# Altium PCB BAT.pcbdoc
Units mil, origin at the board's own origin, x right, y up, seen from the top; angles counter-clockwise.
Board outline 984.3 x 1574.8 mil, 2 copper layers (Top Layer, Bottom Layer), stack 62.2 mil thick; 32 components, 23 nets, 121 pads, 61 vias.
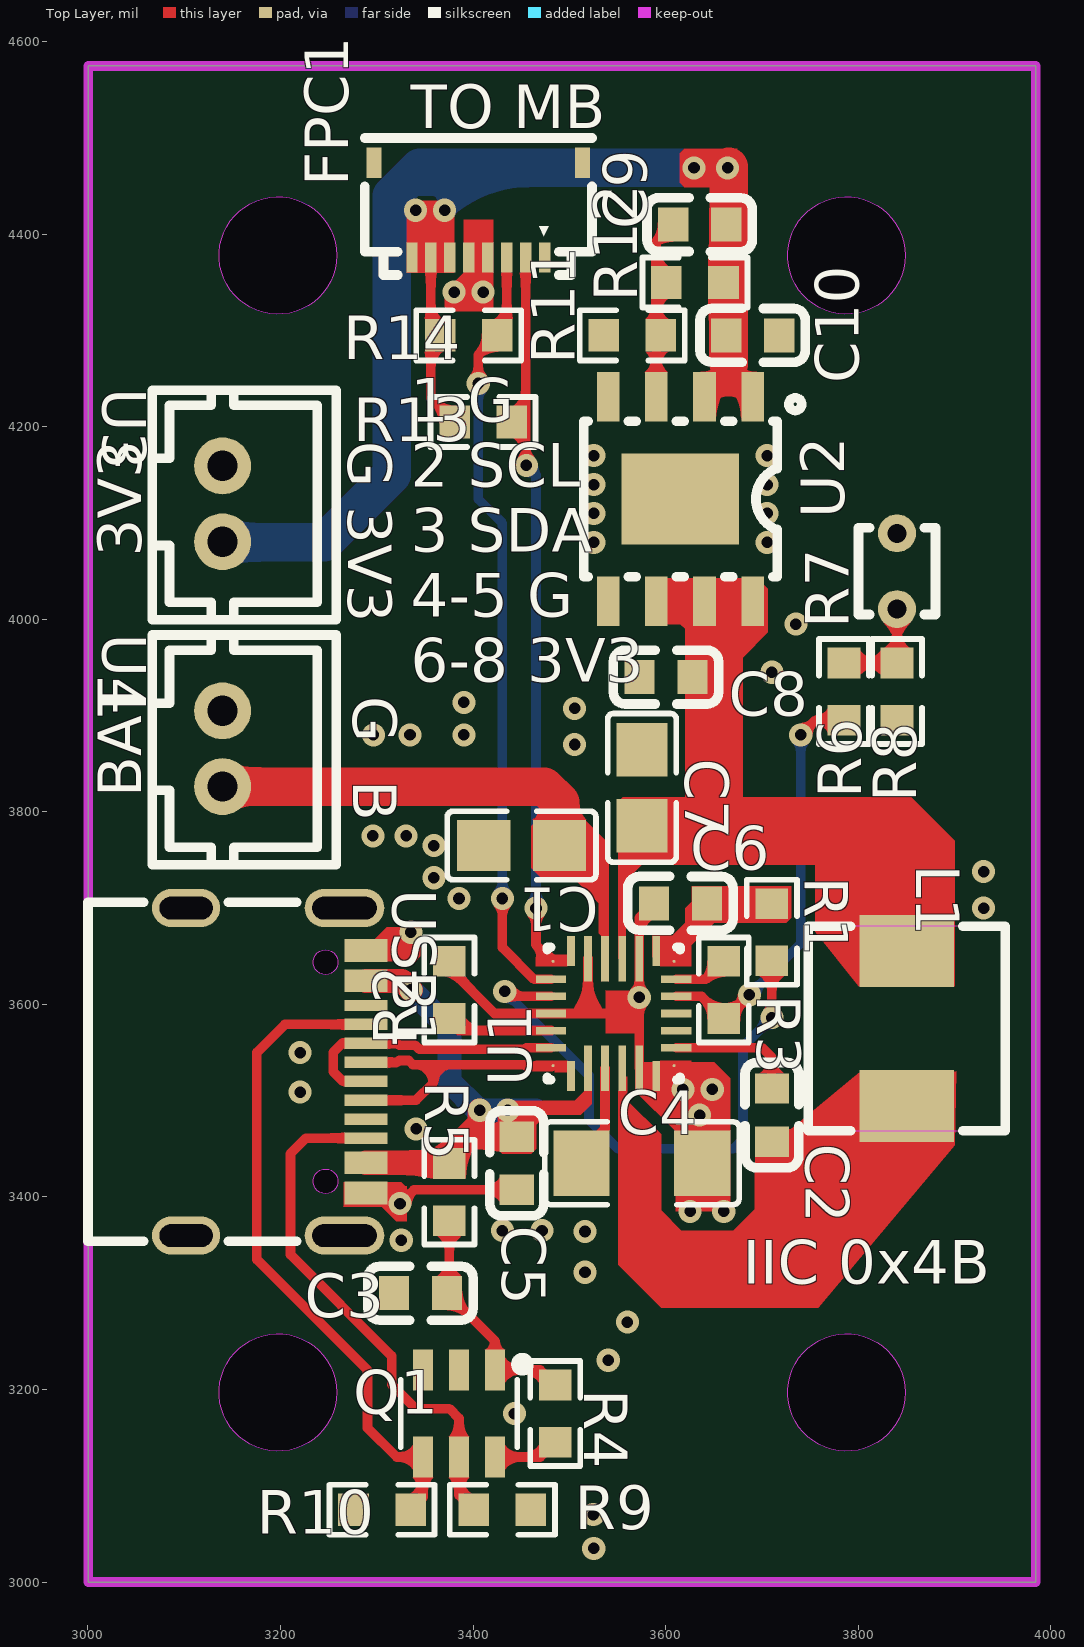
[diagram p0: Top Layer view]
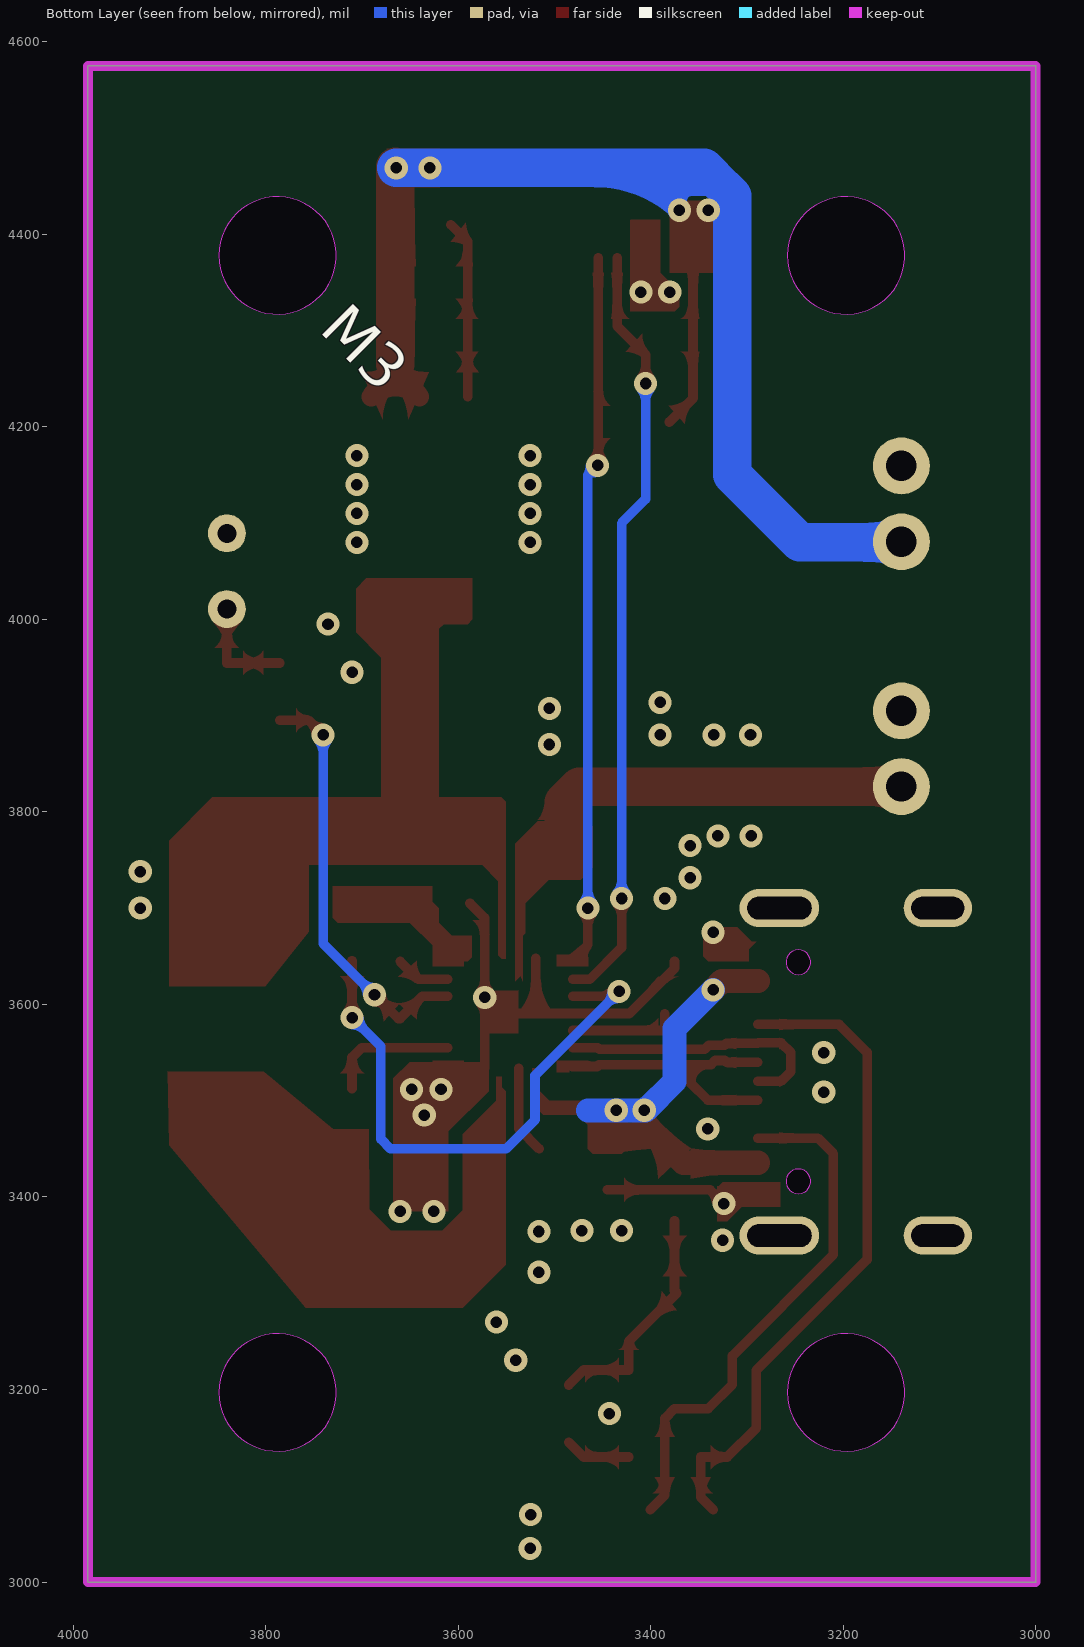
[diagram p1: Bottom Layer view, seen from below]

## Layer stack, top to bottom
Top Solder Mask Layer: solder mask 0.4, Dk 3.3
Top Layer: signal copper 1.4
Dielectric1: surface 59.4, FR4, Dk 4.5
Bottom Layer: signal copper 1.4
Bottom Solder Mask Layer: solder mask 0.4, Dk 3.3

## Board outline
3000.4,4574.8 3000.4,3000 3984.7,3000 3984.7,4574.8
cut-out: 3258.3,3196.9 3257.9,3189.9 3256.7,3183 3254.8,3176.3 3252,3169.9 3248.6,3163.9 3244.5,3158.2 3239.8,3153.1 3234.5,3148.5 3228.8,3144.6 3222.6,3141.3 3216.1,3138.8 3209.4,3137 3202.5,3136.1 3195.5,3135.9 3188.6,3136.4 3181.8,3137.8 3175.1,3140 3168.8,3142.9 3162.8,3146.5 3157.3,3150.7 3152.3,3155.6 3147.9,3161 3144.1,3166.8 3141.1,3173.1 3138.7,3179.7 3137.1,3186.4 3136.4,3193.4 3136.4,3200.3 3137.1,3207.3 3138.7,3214 3141.1,3220.6 3144.1,3226.9 3147.9,3232.7 3152.3,3238.1 3157.3,3243 3162.8,3247.2 3168.8,3250.8 3175.1,3253.7 3181.8,3255.9 3188.6,3257.3 3195.5,3257.8 3202.5,3257.7 3209.4,3256.7 3216.1,3254.9 3222.6,3252.4 3228.8,3249.1 3234.5,3245.2 3239.8,3240.6 3244.5,3235.5 3248.6,3229.8 3252,3223.8 3254.8,3217.4 3256.7,3210.7 3257.9,3203.8
cut-out: 3258.3,4378 3257.9,4371 3256.7,4364.1 3254.8,4357.4 3252,4351 3248.6,4345 3244.5,4339.3 3239.8,4334.2 3234.5,4329.6 3228.8,4325.7 3222.6,4322.4 3216.1,4319.9 3209.4,4318.1 3202.5,4317.2 3195.5,4317 3188.6,4317.6 3181.8,4318.9 3175.1,4321.1 3168.8,4324 3162.8,4327.6 3157.3,4331.8 3152.3,4336.7 3147.9,4342.1 3144.1,4347.9 3141.1,4354.2 3138.7,4360.8 3137.1,4367.5 3136.4,4374.5 3136.4,4381.4 3137.1,4388.4 3138.7,4395.1 3141.1,4401.7 3144.1,4408 3147.9,4413.8 3152.3,4419.2 3157.3,4424.1 3162.8,4428.3 3168.8,4431.9 3175.1,4434.8 3181.8,4437 3188.6,4438.4 3195.5,4439 3202.5,4438.8 3209.4,4437.8 3216.1,4436 3222.6,4433.5 3228.8,4430.2 3234.5,4426.3 3239.8,4421.7 3244.5,4416.6 3248.6,4410.9 3252,4404.9 3254.8,4398.5 3256.7,4391.8 3257.9,4384.9
cut-out: 3848.9,3196.9 3848.5,3189.9 3847.3,3183 3845.3,3176.3 3842.6,3169.9 3839.2,3163.9 3835.1,3158.2 3830.4,3153.1 3825.1,3148.5 3819.3,3144.6 3813.2,3141.3 3806.7,3138.8 3799.9,3137 3793,3136.1 3786.1,3135.9 3779.1,3136.4 3772.3,3137.8 3765.7,3140 3759.3,3142.9 3753.4,3146.5 3747.9,3150.7 3742.9,3155.6 3738.5,3161 3734.7,3166.8 3731.6,3173.1 3729.3,3179.7 3727.7,3186.4 3726.9,3193.4 3726.9,3200.3 3727.7,3207.3 3729.3,3214 3731.6,3220.6 3734.7,3226.9 3738.5,3232.7 3742.9,3238.1 3747.9,3243 3753.4,3247.2 3759.3,3250.8 3765.7,3253.7 3772.3,3255.9 3779.1,3257.3 3786.1,3257.8 3793,3257.7 3799.9,3256.7 3806.7,3254.9 3813.2,3252.4 3819.3,3249.1 3825.1,3245.2 3830.4,3240.6 3835.1,3235.5 3839.2,3229.8 3842.6,3223.8 3845.3,3217.4 3847.3,3210.7 3848.5,3203.8
cut-out: 3848.9,4378 3848.5,4371 3847.3,4364.1 3845.3,4357.4 3842.6,4351 3839.2,4345 3835.1,4339.3 3830.4,4334.2 3825.1,4329.6 3819.3,4325.7 3813.2,4322.4 3806.7,4319.9 3799.9,4318.1 3793,4317.2 3786.1,4317 3779.1,4317.6 3772.3,4318.9 3765.7,4321.1 3759.3,4324 3753.4,4327.6 3747.9,4331.8 3742.9,4336.7 3738.5,4342.1 3734.7,4347.9 3731.6,4354.2 3729.3,4360.8 3727.7,4367.5 3726.9,4374.5 3726.9,4381.4 3727.7,4388.4 3729.3,4395.1 3731.6,4401.7 3734.7,4408 3738.5,4413.8 3742.9,4419.2 3747.9,4424.1 3753.4,4428.3 3759.3,4431.9 3765.7,4434.8 3772.3,4437 3779.1,4438.4 3786.1,4439 3793,4438.8 3799.9,4437.8 3806.7,4436 3813.2,4433.5 3819.3,4430.2 3825.1,4426.3 3830.4,4421.7 3835.1,4416.6 3839.2,4410.9 3842.6,4404.9 3845.3,4398.5 3847.3,4391.8 3848.5,4384.9

## Design rules (kind name [scope] priority, off if disabled: settings)
BoardOutlineClearance copperThickness1oz [All] p0: genericclearance=10 ignorepadtopadclearanceinfootprint=FALSE except(0: Arc-SplitContinuation Track-SplitContinuation SMDPad-SplitContinuation THPad-SplitContinuation Via-SplitContinuation Fill-SplitContinuation Poly-SplitContinuation Region-SplitContinuation Text-SplitContinuation)
BoardOutlineClearance copperThickness2oz [All] p0: genericclearance=10 ignorepadtopadclearanceinfootprint=FALSE except(0: Arc-SplitContinuation Track-SplitContinuation SMDPad-SplitContinuation THPad-SplitContinuation Via-SplitContinuation Fill-SplitContinuation Poly-SplitContinuation Region-SplitContinuation Text-SplitContinuation)
BoardOutlineClearance otherClearance [All] p0: genericclearance=10 ignorepadtopadclearanceinfootprint=FALSE except(0: Arc-SplitContinuation Track-SplitContinuation SMDPad-SplitContinuation THPad-SplitContinuation Via-SplitContinuation Fill-SplitContinuation Poly-SplitContinuation Region-SplitContinuation Text-SplitContinuation)
Clearance copperThickness1oz [All] p1: gap=7 ignorepadtopadclearanceinfootprint=FALSE
Clearance copperThickness2oz [All] p1: gap=7 ignorepadtopadclearanceinfootprint=FALSE
Clearance otherClearance [All] p1: gap=7 ignorepadtopadclearanceinfootprint=FALSE
DiffPairsRouting differentialPair [All] p1: maxuncoupledlength=10 minlimit=6 maxlimit=Infinity mostfreqgap=6 toplayer_minwidth=5 toplayer_prefwidth=10 toplayer_maxwidth=100 bottomlayer_minwidth=5 bottomlayer_prefwidth=10 bottomlayer_maxwidth=100
PasteMaskExpansion pasteMaskExpansion [All] p1: expansion=0
PlaneConnect innerPlane [All] p1: planeconnectstyle=Relief reliefexpansion=20 reliefentries=4 reliefconductorwidth=10 reliefairgap=10
PolygonConnect copperRegion [All] p1: connectstyle=Relief reliefentries=4 reliefconductorwidth=10 polygonreliefangle="90 Angle" airgapwidth=10
PolygonConnect copperRegion1 [All] p1: connectstyle=Direct reliefentries=4 reliefconductorwidth=10 polygonreliefangle="90 Angle" airgapwidth=10
RoutingVias viaSize [All] p1: viastyle="Through Hole" holewidth=12.0078 minholewidth=11.811 maxholewidth=248.0314 width=12.0078 minwidth=11.811 maxwidth=248.0314
SolderMaskExpansion solderMaskExpansion [IsVia] p1: useseparateexpansions=TRUE expansion=-1000 expansionbottom=-1000
SolderMaskExpansion solderMaskExpansion [All] p2: useseparateexpansions=TRUE expansion=2 expansionbottom=2
Width copperThickness1oz [All] p1: maxlimit=100 minlimit=5 preferedwidth=10
Width copperThickness2oz [All] p1: maxlimit=100 minlimit=8 preferedwidth=10

## Components (designator, comment, footprint, x,y, rotation, side; value= is the part's Value field where it differs from the comment)
C1 "22uF" C0805#1 3450.4,3765 r180 top
C2 "47nF" C0603#1 3710.4,3485 r90 top
C3 "1uF" C0603#2 3345.4,3300 r180 top
C4 "10uF" C1206 3575.4,3435 r0 top
C5 "1uF" C0603#1 3445.4,3435 r90 top
C6 "10uF" C0603#2 3615.4,3705 r180 top
C7 "22uF" C0805#2 3575.4,3825 r270 top
C8 "2.2uF" C0603#3 3600.4,3940 r0 top
C9 "100pF" C0603#3 3635.4,4410 r0 top
C10 "2.2uF" C0603#2 3690.4,4295 r180 top
FPC1 "HC-FPC-05-09-8RLTAG" FPC-SMD_8P-P0.50_HC-FPC-05-09-8RLTAG 3405.4,4425 r0 top
L1 "1uH" IND-SMD_L5.4-W5.2_FXL0530 3850.4,3575 r270 top
Q1 "CH221K" SOT-23-6_L2.9-W1.6-P0.95-LS2.8-BL-2 3385.4,3175 r180 top
R1 "100kΩ" R0603#1 3710.4,3675 r270 top
R2 "68kΩ" R0603#1 3375.4,3615 r90 top
R3 "12kΩ" R0603#1 3660.4,3615 r270 top
R4 "20kΩ" R0603#1 3485.4,3175 r90 top
R5 "1kΩ" R0603#1 3375.4,3405 r90 top
R6 "3kΩ" R0603#1 3785.4,3925 r90 top
R7 "WH103AT3950F-2" RES-TH_L2.0-W2.0-P2.00-D0.4 3840.4,4050 r90 top
R8 "10kΩ" R0603#1 3840.4,3925 r270 top
R9 "5.1kΩ" R0603#2 3430.4,3075 r0 top
R10 "5.1kΩ" R0603#3 3305.4,3075 r180 top
R11 "100kΩ" R0603#2 3565.4,4295 r0 top
R12 "120kΩ" R0603#2 3630.4,4350 r0 top
R13 "4.7kΩ" R0603#2 3410.4,4205 r0 top
R14 "4.7kΩ" R0603#2 3395.4,4295 r0 top
U1 "MP2731GQC-0001-Z" QFN-26_L3.5-W3.5-P0.45-TL_MP2733GQC 3546,3590.6 r90 top
U2 "MP20045DN-LF-Z" SOIC-8_L4.9-W3.9-P1.27-LS6.0-TL-EP-2 3615.4,4125 r270 top
U3 "WAFER-PH2.0-2PZZ" CONN-TH_2P-P2.00_HC-PH-2A-M#1 3139.8,4120 r270 top
U4 "WAFER-PH2.0-2PZZ" CONN-TH_2P-P2.00_HC-PH-2A-M#2 3139.8,3865.6 r270 top
USB1 "LAIL-TYPE-C-16PIN-08-WT" TYPE-C-SMD_LAIL-TYPE-C-16PIN-08-WT 3195.4,3530 r270 top

## Footprints (in the part's own frame and the unit in brackets; to place one, negate y for a bottom-side part, rotate by r counter-clockwise, add the part's x,y. Pads: shape width x height; smd on the part's side, far side on the other; paste and mask are expansions set on the pad)
C0603#1 [mil]
  rect 31.5x35.4 smd: 1(-27.6,0) 2(27.6,0)
  silkscreen extent -55,-28 55,28
C0603#2 [mil]
  rect 31.5x35.4 smd: 1(-27.6,0) 2(27.5,0)
  silkscreen extent -55,-28 55,28
C0603#3 [mil]
  rect 31.5x35.4 smd: 1(-27.5,0) 2(27.6,0)
  silkscreen extent -55,-28 55,28
C0805#1 [mil]
  rect 55.5x53.1 smd paste-3937 mask+2: 1(-39.4,0) 2(39.3,0)
  silkscreen extent -77,-36 77,36
C0805#2 [mil]
  rect 55.5x53.1 smd paste-3937 mask+2: 1(-39.4,0) 2(39.4,0)
  silkscreen extent -77,-36 77,36
C1206 [mil]
  rect 58.5x68 smd paste-3937 mask+2: 1(-62.7,0) 2(62.7,0)
  silkscreen extent -101,-43 101,43
CONN-TH_2P-P2.00_HC-PH-2A-M#1 [mil]
  round 59.1 hole 31.5 paste+0 mask+2: 1(-39.4,0) 2(39.4,0)
  silkscreen extent -118,-73 121,118
CONN-TH_2P-P2.00_HC-PH-2A-M#2 [mil]
  round 59.1 hole 31.5 paste+0 mask+2: 1(-39.4,0) 2(39.3,0)
  silkscreen extent -118,-73 120,118
FPC-SMD_8P-P0.50_HC-FPC-05-09-8RLTAG [mil]
  rect 11.8x31.5 smd paste+0 mask+2: 1(68.9,-49.2) 2(49.2,-49.2) 3(29.6,-49.2) 4(9.9,-49.2) 5(-9.8,-49.2) 6(-29.5,-49.2) 7(-49.2,-49.2) 8(-68.9,-49.2)
  rect 15.7x31.5 smd paste+0 mask+2: 9(-108.2,49.2) 10(108.3,49.2)
  silkscreen extent -118,-67 118,75
IND-SMD_L5.4-W5.2_FXL0530 [mil]
  rect 74.8x98.4 smd: 1(-80.7,0) 2(80.7,0)
  silkscreen extent -106,-102 106,102
QFN-26_L3.5-W3.5-P0.45-TL_MP2733GQC [mil]
  rect 31.5x7.9 smd paste-3937 mask+2: 1(-65,44.3) 6(-65,-44.3) 14(64.9,-44.3) 19(64.9,44.3)
  rect 47.2x7.9 smd paste-3937 mask+2: 2(-57.1,26.6) 3(-57.1,8.9) 4(-57.1,-8.8) 5(-57.1,-26.6) 15(57,-26.6) 16(57,-8.8) 17(57,8.9) 18(57,26.6)
  round 3 smd: 7(-54.2,-62.8) 13(54.1,-62.8) 20(54.1,62.9) 26(-54.2,62.9)
  rect 7.9x31.5 smd paste-3937 mask+2: 8(-35.5,-64.9) 9(-17.8,-64.9) 10(0,-64.9) 11(17.7,-64.9) 12(35.4,-64.9) 21(35.4,65) 22(17.7,65) 23(0,65) 24(-17.8,65) 25(-35.5,65)
  Top Layer region: 61,48.2 49.2,48.2 49.2,80.7 57.1,80.7 57.1,61 61,61
  Top Layer region: 61,-48.2 49.2,-48.2 49.2,-80.7 57,-80.7 57,-61 61,-61
  Top Layer region: -61.1,48.2 -49.3,48.2 -49.3,80.7 -57.1,80.7 -57.1,61 -61.1,61
  Top Layer region: -61.1,-48.2 -49.3,-48.2 -49.3,-80.7 -57.1,-80.7 -57.1,-61 -61.1,-61
  silkscreen extent -69,-69 69,69
R0603#1 [mil]
  rect 31.8x34 smd paste-3937 mask+2: 1(-29.7,0) 2(29.7,0)
  silkscreen extent -55,-26 55,26
R0603#2 [mil]
  rect 31.8x34 smd paste-3937 mask+2: 1(-29.6,0) 2(29.7,0)
  silkscreen extent -54,-26 55,26
R0603#3 [mil]
  rect 31.8x34 smd paste-3937 mask+2: 1(-29.7,0) 2(29.6,0)
  silkscreen extent -55,-26 54,26
RES-TH_L2.0-W2.0-P2.00-D0.4 [mil]
  round 39.4 hole 19.7 paste+0 mask+2: 1(-39.4,0) 2(39.4,0)
  silkscreen extent -45,-40 45,40
SOIC-8_L4.9-W3.9-P1.27-LS6.0-TL-EP-2 [mil]
  rect 51.2x23.6 smd: 1(-106.3,75) 2(-106.3,25) 3(-106.3,-25) 4(-106.3,-75) 5(106.3,-75) 6(106.3,-25) 7(106.3,25) 8(106.3,75)
  rect 94.9x122 smd: 9(0,0)
  silkscreen extent -105,-100 81,126
SOT-23-6_L2.9-W1.6-P0.95-LS2.8-BL-2 [mil]
  rect 20.9x42.2 smd: 1(-37.4,-45.2) 2(0,-45.2) 3(37.4,-45.2) 4(37.4,45.2) 5(0,45.2) 6(-37.4,45.2)
  silkscreen extent -72,-57 61,35
TYPE-C-SMD_LAIL-TYPE-C-16PIN-08-WT [mil]
  oval 39.4x82.7 hole 23.6 slot 66.9 at 90 deg paste+0 mask+2: 13(170.1,71.1) 16(-170.1,71.1)
  oval 39.4x70.9 hole 23.6 slot 55.1 at 90 deg paste+0 mask+2: 14(170.1,-93.5) 15(-170.1,-93.5)
  rect 23.6x44.9 smd paste-3937 mask+2: A1B12(-126,93.5) A4B9(-94.5,93.5) B1A12(126,93.5) B4A9(94.5,93.5)
  rect 11.8x44.9 smd paste-3937 mask+2: A5(-49.2,93.5) A6(-9.8,93.5) A7(9.8,93.5) A8(49.2,93.5) B5(68.9,93.5) B6(29.5,93.5) B7(-29.5,93.5) B8(-68.9,93.5)
  Board Outline Layer lines w0.1: 115.3,38.7 118.3,39.4 121,40.9 123.4,42.9 125.1,45.5 126.2,48.3 126.6,51.4 126.2,54.5 125.1,57.4 123.4,59.9 121,61.9 118.3,63.4 115.3,64.1 112.2,64.1 109.2,63.4 106.5,61.9 104.2,59.9 102.5,57.4 101.4,54.5 101,51.4 101.4,48.3 102.5,45.5 104.2,42.9 106.5,40.9 109.2,39.4 112.2,38.7 115.3,38.7 ; -112.2,38.7 -109.2,39.4 -106.5,40.9 -104.2,42.9 -102.5,45.5 -101.4,48.3 -101,51.4 -101.4,54.5 -102.5,57.4 -104.2,59.9 -106.5,61.9 -109.2,63.4 -112.2,64.1 -115.3,64.1 -118.3,63.4 -121,61.9 -123.4,59.9 -125.1,57.4 -126.2,54.5 -126.6,51.4 -126.2,48.3 -125.1,45.5 -123.4,42.9 -121,40.9 -118.3,39.4 -115.3,38.7 -112.2,38.7
  Board Outline Layer region: -101,51.4 -101.4,48.3 -102.5,45.5 -104.2,42.9 -106.5,40.9 -109.2,39.4 -112.2,38.7 -115.3,38.7 -118.3,39.4 -121,40.9 -123.4,42.9 -125.1,45.5 -126.2,48.3 -126.6,51.4 -126.2,54.5 -125.1,57.4 -123.4,59.9 -121,61.9 -118.3,63.4 -115.3,64.1 -112.2,64.1 -109.2,63.4 -106.5,61.9 -104.2,59.9 -102.5,57.4 -101.4,54.5
  Board Outline Layer region: -101,51.4 -101.4,48.3 -102.5,45.5 -104.2,42.9 -106.5,40.9 -109.2,39.4 -112.2,38.7 -115.3,38.7 -118.3,39.4 -121,40.9 -123.4,42.9 -125.1,45.5 -126.2,48.3 -126.6,51.4 -126.2,54.5 -125.1,57.4 -123.4,59.9 -121,61.9 -118.3,63.4 -115.3,64.1 -112.2,64.1 -109.2,63.4 -106.5,61.9 -104.2,59.9 -102.5,57.4 -101.4,54.5
  Board Outline Layer region: 126.6,51.4 126.2,48.3 125.1,45.5 123.4,42.9 121,40.9 118.3,39.4 115.3,38.7 112.2,38.7 109.2,39.4 106.5,40.9 104.2,42.9 102.5,45.5 101.4,48.3 101,51.4 101.4,54.5 102.5,57.4 104.2,59.9 106.5,61.9 109.2,63.4 112.2,64.1 115.3,64.1 118.3,63.4 121,61.9 123.4,59.9 125.1,57.4 126.2,54.5
  Board Outline Layer region: 126.6,51.4 126.2,48.3 125.1,45.5 123.4,42.9 121,40.9 118.3,39.4 115.3,38.7 112.2,38.7 109.2,39.4 106.5,40.9 104.2,42.9 102.5,45.5 101.4,48.3 101,51.4 101.4,54.5 102.5,57.4 104.2,59.9 106.5,61.9 109.2,63.4 112.2,64.1 115.3,64.1 118.3,63.4 121,61.9 123.4,59.9 125.1,57.4 126.2,54.5
  Multi-Layer board cut-out: -101,51.4 -101.4,48.3 -102.5,45.5 -104.2,42.9 -106.5,40.9 -109.2,39.4 -112.2,38.7 -115.3,38.7 -118.3,39.4 -121,40.9 -123.4,42.9 -125.1,45.5 -126.2,48.3 -126.6,51.4 -126.2,54.5 -125.1,57.4 -123.4,59.9 -121,61.9 -118.3,63.4 -115.3,64.1 -112.2,64.1 -109.2,63.4 -106.5,61.9 -104.2,59.9 -102.5,57.4 -101.4,54.5
  Multi-Layer board cut-out: 126.6,51.4 126.2,48.3 125.1,45.5 123.4,42.9 121,40.9 118.3,39.4 115.3,38.7 112.2,38.7 109.2,39.4 106.5,40.9 104.2,42.9 102.5,45.5 101.4,48.3 101,51.4 101.4,54.5 102.5,57.4 104.2,59.9 106.5,61.9 109.2,63.4 112.2,64.1 115.3,64.1 118.3,63.4 121,61.9 123.4,59.9 125.1,57.4 126.2,54.5
  silkscreen extent -176,-195 176,21

## Via types
v1: diameter 24, hole 12, Top Layer to Bottom Layer, 61 vias

## Nets (pads, with @x,y where several pads share a name; then routed paths per layer and width w, separated by ;. In a path a pad name is that pad's centre, name@x,y a point inside that pad or via, vN(x,y) a via of type N, cw(c..) or ccw(c..) an arc to the next point about the centre after c; other vN are vias at no path point)
3V3: C9.2 C10.2 FPC1.6 FPC1.7 FPC1.8 R12.2 R13.1 R14.1 U2.1 U2.2 U3.2 | length 1463.3
  Top Layer w10: FPC1.7 3356.2,4229.6 R13.1
  Top Layer w20: U2.2 3665.4,4256.3 U2.1
  Top Layer w40: 3665.4,4265 v1@3665.4,4470
  Bottom Layer w20: 3315.4,4440 3330.4,4425 v1(3340.4,4425) ; v1(3370.4,4425) 3405.4,4460
  Bottom Layer w40: U3.2 3140.4,4080 3245.4,4080 3315.4,4150 3315.4,4440 3335.4,4460 ; 3405.4,4460 3335.4,4460 ; v1(3664.5,4469) v1(3629.5,4469) 3344.5,4469 3335.4,4460
$1N6: C9.1 R11.2 R12.1 U2.3 | length 186
  Top Layer w10: U2.3 3590.4,4392.6 C9.1
$1N13: R3.1 U1.12 | length 57.3
  Top Layer w10: U1.12 3641.8,3626 R3.1
$1N14: R3.2 R6.1 U1.11 | length 439.4
  Top Layer w10: U1.11 3637.5,3608.3 R3.2 3662.4,3585.3 v1(3687.1,3610) ; v1(3740.4,3880) 3755.8,3895.3 R6.1
  Bottom Layer w10: v1(3687.1,3610) 3740.4,3663.3 v1(3740.4,3880)
$1N16: R1.2 U1.22 | length 594.4
  Top Layer w10: v1(3432.9,3613.6) 3438.2,3608.3 U1.22 ; v1(3710.4,3586.3) R1.2
  Bottom Layer w10: v1(3432.9,3613.6) 3520.4,3526.1 3520.4,3480 3550.4,3450 3670.4,3450 3680.4,3460 3680.4,3556.3 v1(3710.4,3586.3)
$1N18: R2.1 U1.24 | length 113
  Top Layer w10: R2.1@3385.4,3590.3 3385.4,3572.9 U1.24@3481,3572.9
$1N30: C2.2 U1.8 | length 136.1
  Top Layer w10: U1.8 3700.3,3555.1 3710.4,3545 C2.2
$1N35: C4.1 U1.3 | length 92.2
  Top Layer w10: C4.1@3516.1,3450 3537.1,3471.1 U1.3
$1N51: Q1.6 R4.1 | length 69
  Top Layer w10: Q1.6 3469.8,3129.8 R4.1
$1N52: C3.1 Q1.1 R4.2 R5.1 | length 245.7
  Top Layer w10: R5.1 3375.4,3302.4 C3.1 3422.8,3250.2 Q1.1 3469.8,3220.2 R4.2
$1N68: R6.2 R7.1 R8.1 | length 113
  Top Layer w10: R6.2 R8.1 3840.4,4005.6 R7.1@3835.4,4010.6
CC1: Q1.4 R10.1 USB1.A5 | length 693.5
  Top Layer w10: USB1.A5 3204.6,3579.2 3175.4,3550 3175.4,3335 3290.4,3220 3290.4,3160 3320.7,3129.8 Q1.4 3348,3087.9 R10.1
CC2: Q1.5 R9.1 USB1.B5 | length 554.6
  Top Layer w10: USB1.B5 3226.5,3461.1 3210.4,3445 3210.4,3340 3315.4,3235 3315.4,3205 3340.4,3180 3375.4,3180 3385.4,3170 Q1.5 3385.4,3090.3 R9.1
GND: C1.2 C3.2 C4.2 C5.1 C6.2 C7.1 C8.1 C10.1 FPC1.1 FPC1.4 FPC1.5 FPC1.9 FPC1.10 Q1.2 R2.2 R7.2 R8.2 R9.2 R10.2 R11.1 U1.5 U1.6 U1.7 U1.15 U1.18 U1.23 U2.4 U2.9 U3.1 U4.1 USB1.13 USB1.14 USB1.15 USB1.16 USB1.A1B12 USB1.B1A12 | length 586.5
  Top Layer w10: v1(3324.1,3393) 3338.6,3407.4 C5.1 ; R2.2 3375.4,3637.5 3422.3,3590.6 U1.23 3519.3,3590.6 3571.3,3590.6 3572.6,3589.3 ; 3519.4,3590.6 U1.18@3519.4,3647.7 ; U1.5 3572.6,3589.3 ; C6.2 3572.6,3689.7 3572.6,3647.7 v1(3572.6,3607.2) 3572.6,3589.3
  other v1: 3525.4,3035 3524.9,3070 3443,3175 3540.4,3230.4 3560.4,3270 3516.3,3321.8 3325.4,3355 3516.3,3364.1 3430.4,3365 3471.6,3365 3625.4,3385 3660.4,3385 3340.9,3470.7 3635.4,3485 3220.4,3508.9 3618,3511.8 3648.5,3511.8 3220.4,3550 3335.4,3675 3930.4,3700 3385.4,3710 3359.3,3731.6 3930.4,3738 3359.3,3765 3295.9,3775 3330.4,3775 3505.4,3870 3296.5,3880 3334.5,3880 3390.4,3880 3505.4,3907.5 3390.4,3913.8 3710.4,3945 3735.4,3995 3525.4,4080 3705.4,4080 3525.4,4110 3705.4,4110 3525.4,4140 3705.4,4140 3525.4,4170 3705.4,4170 3380.4,4340 3410.4,4340
P_DN: U1.25 USB1.A7 USB1.B7 | length 292.4
  Top Layer w10: USB1.A7 3288.8,3520 3264.9,3520 3254.6,3530.3 3254.6,3550 3264.6,3560 3288.5,3560 USB1.B7 3321.4,3559.5 3323.2,3557.7 3339.8,3557.7 3344.3,3553.3 3453.4,3553.3 3455.3,3555.1 U1.25
P_DP: U1.1 U1.26 USB1.A6 USB1.B6 | length 292.2
  Top Layer w10: USB1.B6 3340.9,3500.5 3358.8,3518.4 3358.8,3537.3 ; USB1.A6 3321.4,3539.8 3323.2,3541.7 3333.2,3541.7 3337.6,3537.3 3358.8,3537.3 ; 3481.5,3535.4 3455.8,3535.4 3453.9,3537.3 3358.8,3537.3
SCL_B: FPC1.2 R13.2 U1.19 U1.20 | length 741.2
  Top Layer w10: FPC1.2 3454.6,4160.8 v1(3455.4,4160) ; v1(3465.4,3700) 3465.4,3661.8 3481.5,3645.7
  Bottom Layer w10: v1(3455.4,4160) 3465.4,4150 v1(3465.4,3700)
SDA_B: FPC1.3 R14.2 U1.21 | length 803.7
  Top Layer w10: v1(3405.4,4245) 3405.4,4275 3435,4304.5 FPC1.3 ; v1(3430.4,3710) 3430.4,3659.1 3463.5,3626 U1.21
  Bottom Layer w10: v1(3405.4,4245) 3405.4,4125 3430.4,4100 v1(3430.4,3710)
SW: C2.1 L1.2 U1.4
SYS: C7.2 C8.2 L1.1 U1.16 U2.6 U2.7 U2.8
VBAT: C1.1 U1.17 U4.2 | length 402.6
  Top Layer w40: U4.2 3474.2,3826.3 3490.4,3810 3490.4,3765.6 C1.1
VBUS: C5.2 R5.2 U1.2 USB1.A4B9 USB1.B4A9 | length 490.3
  Top Layer w10: v1@3440.4,3490 3465.4,3490
  Top Layer w25: USB1.B4A9 3365.9,3435.5 3393,3462.6 ; USB1.A4B9 3325.9,3624.5 v1(3335.4,3615) ; v1(3406.9,3490) 3406.9,3476.5 3393,3462.6 ; C5.2 3393,3462.6
  Bottom Layer w25: v1(3335.4,3615) 3375.4,3575 3375.4,3520 3405.4,3490 v1(3406.9,3490) v1(3436,3490) 3465.4,3490
VREF: C6.1 R1.1 U1.13 U1.14
pads on no net: Q1.3 U1.9 U1.10 U2.5 USB1.A8 USB1.B8

## Polygon pours and split planes (outlines as drawn)
GND on Top Layer (solid, remove dead copper, pour order 0): 3000.4,4574.8 3000.4,3000 3984.7,3000 3984.7,4574.8
GND on Bottom Layer (solid, remove dead copper, pour order 2): 3000.4,4574.8 3000.4,3000 3984.7,3000 3984.7,4574.8

## Keep-outs
Top Layer:
  region: 3748.1,3681.3 3748.1,3468.7 3952.8,3468.7 3952.8,3681.3
Board Outline Layer:
  region: 3258.3,3196.9 3257.9,3189.9 3256.7,3183 3254.8,3176.3 3252,3169.9 3248.6,3163.9 3244.5,3158.2 3239.8,3153.1 3234.5,3148.5 3228.8,3144.6 3222.6,3141.3 3216.1,3138.8 3209.4,3137 3202.5,3136.1 3195.5,3135.9 3188.6,3136.4 3181.8,3137.8 3175.1,3140 3168.8,3142.9 3162.8,3146.5 3157.3,3150.7 3152.3,3155.6 3147.9,3161 3144.1,3166.8 3141.1,3173.1 3138.7,3179.7 3137.1,3186.4 3136.4,3193.4 3136.4,3200.3 3137.1,3207.3 3138.7,3214 3141.1,3220.6 3144.1,3226.9 3147.9,3232.7 3152.3,3238.1 3157.3,3243 3162.8,3247.2 3168.8,3250.8 3175.1,3253.7 3181.8,3255.9 3188.6,3257.3 3195.5,3257.8 3202.5,3257.7 3209.4,3256.7 3216.1,3254.9 3222.6,3252.4 3228.8,3249.1 3234.5,3245.2 3239.8,3240.6 3244.5,3235.5 3248.6,3229.8 3252,3223.8 3254.8,3217.4 3256.7,3210.7 3257.9,3203.8
  region: 3258.3,3196.9 3257.9,3189.9 3256.7,3183 3254.8,3176.3 3252,3169.9 3248.6,3163.9 3244.5,3158.2 3239.8,3153.1 3234.5,3148.5 3228.8,3144.6 3222.6,3141.3 3216.1,3138.8 3209.4,3137 3202.5,3136.1 3195.5,3135.9 3188.6,3136.4 3181.8,3137.8 3175.1,3140 3168.8,3142.9 3162.8,3146.5 3157.3,3150.7 3152.3,3155.6 3147.9,3161 3144.1,3166.8 3141.1,3173.1 3138.7,3179.7 3137.1,3186.4 3136.4,3193.4 3136.4,3200.3 3137.1,3207.3 3138.7,3214 3141.1,3220.6 3144.1,3226.9 3147.9,3232.7 3152.3,3238.1 3157.3,3243 3162.8,3247.2 3168.8,3250.8 3175.1,3253.7 3181.8,3255.9 3188.6,3257.3 3195.5,3257.8 3202.5,3257.7 3209.4,3256.7 3216.1,3254.9 3222.6,3252.4 3228.8,3249.1 3234.5,3245.2 3239.8,3240.6 3244.5,3235.5 3248.6,3229.8 3252,3223.8 3254.8,3217.4 3256.7,3210.7 3257.9,3203.8
  region: 3258.3,4378 3257.9,4371 3256.7,4364.1 3254.8,4357.4 3252,4351 3248.6,4345 3244.5,4339.3 3239.8,4334.2 3234.5,4329.6 3228.8,4325.7 3222.6,4322.4 3216.1,4319.9 3209.4,4318.1 3202.5,4317.2 3195.5,4317 3188.6,4317.6 3181.8,4318.9 3175.1,4321.1 3168.8,4324 3162.8,4327.6 3157.3,4331.8 3152.3,4336.7 3147.9,4342.1 3144.1,4347.9 3141.1,4354.2 3138.7,4360.8 3137.1,4367.5 3136.4,4374.5 3136.4,4381.4 3137.1,4388.4 3138.7,4395.1 3141.1,4401.7 3144.1,4408 3147.9,4413.8 3152.3,4419.2 3157.3,4424.1 3162.8,4428.3 3168.8,4431.9 3175.1,4434.8 3181.8,4437 3188.6,4438.4 3195.5,4439 3202.5,4438.8 3209.4,4437.8 3216.1,4436 3222.6,4433.5 3228.8,4430.2 3234.5,4426.3 3239.8,4421.7 3244.5,4416.6 3248.6,4410.9 3252,4404.9 3254.8,4398.5 3256.7,4391.8 3257.9,4384.9
  region: 3258.3,4378 3257.9,4371 3256.7,4364.1 3254.8,4357.4 3252,4351 3248.6,4345 3244.5,4339.3 3239.8,4334.2 3234.5,4329.6 3228.8,4325.7 3222.6,4322.4 3216.1,4319.9 3209.4,4318.1 3202.5,4317.2 3195.5,4317 3188.6,4317.6 3181.8,4318.9 3175.1,4321.1 3168.8,4324 3162.8,4327.6 3157.3,4331.8 3152.3,4336.7 3147.9,4342.1 3144.1,4347.9 3141.1,4354.2 3138.7,4360.8 3137.1,4367.5 3136.4,4374.5 3136.4,4381.4 3137.1,4388.4 3138.7,4395.1 3141.1,4401.7 3144.1,4408 3147.9,4413.8 3152.3,4419.2 3157.3,4424.1 3162.8,4428.3 3168.8,4431.9 3175.1,4434.8 3181.8,4437 3188.6,4438.4 3195.5,4439 3202.5,4438.8 3209.4,4437.8 3216.1,4436 3222.6,4433.5 3228.8,4430.2 3234.5,4426.3 3239.8,4421.7 3244.5,4416.6 3248.6,4410.9 3252,4404.9 3254.8,4398.5 3256.7,4391.8 3257.9,4384.9
  region: 3848.9,3196.9 3848.5,3189.9 3847.3,3183 3845.3,3176.3 3842.6,3169.9 3839.2,3163.9 3835.1,3158.2 3830.4,3153.1 3825.1,3148.5 3819.3,3144.6 3813.2,3141.3 3806.7,3138.8 3799.9,3137 3793,3136.1 3786.1,3135.9 3779.1,3136.4 3772.3,3137.8 3765.7,3140 3759.3,3142.9 3753.4,3146.5 3747.9,3150.7 3742.9,3155.6 3738.5,3161 3734.7,3166.8 3731.6,3173.1 3729.3,3179.7 3727.7,3186.4 3726.9,3193.4 3726.9,3200.3 3727.7,3207.3 3729.3,3214 3731.6,3220.6 3734.7,3226.9 3738.5,3232.7 3742.9,3238.1 3747.9,3243 3753.4,3247.2 3759.3,3250.8 3765.7,3253.7 3772.3,3255.9 3779.1,3257.3 3786.1,3257.8 3793,3257.7 3799.9,3256.7 3806.7,3254.9 3813.2,3252.4 3819.3,3249.1 3825.1,3245.2 3830.4,3240.6 3835.1,3235.5 3839.2,3229.8 3842.6,3223.8 3845.3,3217.4 3847.3,3210.7 3848.5,3203.8
  region: 3848.9,3196.9 3848.5,3189.9 3847.3,3183 3845.3,3176.3 3842.6,3169.9 3839.2,3163.9 3835.1,3158.2 3830.4,3153.1 3825.1,3148.5 3819.3,3144.6 3813.2,3141.3 3806.7,3138.8 3799.9,3137 3793,3136.1 3786.1,3135.9 3779.1,3136.4 3772.3,3137.8 3765.7,3140 3759.3,3142.9 3753.4,3146.5 3747.9,3150.7 3742.9,3155.6 3738.5,3161 3734.7,3166.8 3731.6,3173.1 3729.3,3179.7 3727.7,3186.4 3726.9,3193.4 3726.9,3200.3 3727.7,3207.3 3729.3,3214 3731.6,3220.6 3734.7,3226.9 3738.5,3232.7 3742.9,3238.1 3747.9,3243 3753.4,3247.2 3759.3,3250.8 3765.7,3253.7 3772.3,3255.9 3779.1,3257.3 3786.1,3257.8 3793,3257.7 3799.9,3256.7 3806.7,3254.9 3813.2,3252.4 3819.3,3249.1 3825.1,3245.2 3830.4,3240.6 3835.1,3235.5 3839.2,3229.8 3842.6,3223.8 3845.3,3217.4 3847.3,3210.7 3848.5,3203.8
  region: 3848.9,4378 3848.5,4371 3847.3,4364.1 3845.3,4357.4 3842.6,4351 3839.2,4345 3835.1,4339.3 3830.4,4334.2 3825.1,4329.6 3819.3,4325.7 3813.2,4322.4 3806.7,4319.9 3799.9,4318.1 3793,4317.2 3786.1,4317 3779.1,4317.6 3772.3,4318.9 3765.7,4321.1 3759.3,4324 3753.4,4327.6 3747.9,4331.8 3742.9,4336.7 3738.5,4342.1 3734.7,4347.9 3731.6,4354.2 3729.3,4360.8 3727.7,4367.5 3726.9,4374.5 3726.9,4381.4 3727.7,4388.4 3729.3,4395.1 3731.6,4401.7 3734.7,4408 3738.5,4413.8 3742.9,4419.2 3747.9,4424.1 3753.4,4428.3 3759.3,4431.9 3765.7,4434.8 3772.3,4437 3779.1,4438.4 3786.1,4439 3793,4438.8 3799.9,4437.8 3806.7,4436 3813.2,4433.5 3819.3,4430.2 3825.1,4426.3 3830.4,4421.7 3835.1,4416.6 3839.2,4410.9 3842.6,4404.9 3845.3,4398.5 3847.3,4391.8 3848.5,4384.9
  region: 3848.9,4378 3848.5,4371 3847.3,4364.1 3845.3,4357.4 3842.6,4351 3839.2,4345 3835.1,4339.3 3830.4,4334.2 3825.1,4329.6 3819.3,4325.7 3813.2,4322.4 3806.7,4319.9 3799.9,4318.1 3793,4317.2 3786.1,4317 3779.1,4317.6 3772.3,4318.9 3765.7,4321.1 3759.3,4324 3753.4,4327.6 3747.9,4331.8 3742.9,4336.7 3738.5,4342.1 3734.7,4347.9 3731.6,4354.2 3729.3,4360.8 3727.7,4367.5 3726.9,4374.5 3726.9,4381.4 3727.7,4388.4 3729.3,4395.1 3731.6,4401.7 3734.7,4408 3738.5,4413.8 3742.9,4419.2 3747.9,4424.1 3753.4,4428.3 3759.3,4431.9 3765.7,4434.8 3772.3,4437 3779.1,4438.4 3786.1,4439 3793,4438.8 3799.9,4437.8 3806.7,4436 3813.2,4433.5 3819.3,4430.2 3825.1,4426.3 3830.4,4421.7 3835.1,4416.6 3839.2,4410.9 3842.6,4404.9 3845.3,4398.5 3847.3,4391.8 3848.5,4384.9
  lines w0.1: 3136.4,3193.4 3137.1,3186.4 3138.7,3179.7 3141.1,3173.1 3144.1,3166.8 3147.9,3161 3152.3,3155.6 3157.3,3150.7 3162.8,3146.5 3168.8,3142.9 3175.1,3140 3181.8,3137.8 3188.6,3136.4 3195.5,3135.9 3202.5,3136.1 3209.4,3137 3216.1,3138.8 3222.6,3141.3 3228.8,3144.6 3234.5,3148.5 3239.8,3153.1 3244.5,3158.2 3248.6,3163.9 3252,3169.9 3254.8,3176.3 3256.7,3183 3257.9,3189.9 3258.3,3196.9 3257.9,3203.8 3256.7,3210.7 3254.8,3217.4 3252,3223.8 3248.6,3229.8 3244.5,3235.5 3239.8,3240.6 3234.5,3245.2 3228.8,3249.1 3222.6,3252.4 3216.1,3254.9 3209.4,3256.7 3202.5,3257.7 3195.5,3257.8 3188.6,3257.3 3181.8,3255.9 3175.1,3253.7 3168.8,3250.8 3162.8,3247.2 3157.3,3243 3152.3,3238.1 3147.9,3232.7 3144.1,3226.9 3141.1,3220.6 3138.7,3214 3137.1,3207.3 3136.4,3200.3 3136.4,3193.4 ; 3136.4,4374.5 3137.1,4367.5 3138.7,4360.8 3141.1,4354.2 3144.1,4347.9 3147.9,4342.1 3152.3,4336.7 3157.3,4331.8 3162.8,4327.6 3168.8,4324 3175.1,4321.1 3181.8,4318.9 3188.6,4317.6 3195.5,4317 3202.5,4317.2 3209.4,4318.1 3216.1,4319.9 3222.6,4322.4 3228.8,4325.7 3234.5,4329.6 3239.8,4334.2 3244.5,4339.3 3248.6,4345 3252,4351 3254.8,4357.4 3256.7,4364.1 3257.9,4371 3258.3,4378 3257.9,4384.9 3256.7,4391.8 3254.8,4398.5 3252,4404.9 3248.6,4410.9 3244.5,4416.6 3239.8,4421.7 3234.5,4426.3 3228.8,4430.2 3222.6,4433.5 3216.1,4436 3209.4,4437.8 3202.5,4438.8 3195.5,4439 3188.6,4438.4 3181.8,4437 3175.1,4434.8 3168.8,4431.9 3162.8,4428.3 3157.3,4424.1 3152.3,4419.2 3147.9,4413.8 3144.1,4408 3141.1,4401.7 3138.7,4395.1 3137.1,4388.4 3136.4,4381.4 3136.4,4374.5 ; 3726.9,3193.4 3727.7,3186.4 3729.3,3179.7 3731.6,3173.1 3734.7,3166.8 3738.5,3161 3742.9,3155.6 3747.9,3150.7 3753.4,3146.5 3759.3,3142.9 3765.7,3140 3772.3,3137.8 3779.1,3136.4 3786.1,3135.9 3793,3136.1 3799.9,3137 3806.7,3138.8 3813.2,3141.3 3819.3,3144.6 3825.1,3148.5 3830.4,3153.1 3835.1,3158.2 3839.2,3163.9 3842.6,3169.9 3845.3,3176.3 3847.3,3183 3848.5,3189.9 3848.9,3196.9 3848.5,3203.8 3847.3,3210.7 3845.3,3217.4 3842.6,3223.8 3839.2,3229.8 3835.1,3235.5 3830.4,3240.6 3825.1,3245.2 3819.3,3249.1 3813.2,3252.4 3806.7,3254.9 3799.9,3256.7 3793,3257.7 3786.1,3257.8 3779.1,3257.3 3772.3,3255.9 3765.7,3253.7 3759.3,3250.8 3753.4,3247.2 3747.9,3243 3742.9,3238.1 3738.5,3232.7 3734.7,3226.9 3731.6,3220.6 3729.3,3214 3727.7,3207.3 3726.9,3200.3 3726.9,3193.4 ; 3726.9,4374.5 3727.7,4367.5 3729.3,4360.8 3731.6,4354.2 3734.7,4347.9 3738.5,4342.1 3742.9,4336.7 3747.9,4331.8 3753.4,4327.6 3759.3,4324 3765.7,4321.1 3772.3,4318.9 3779.1,4317.6 3786.1,4317 3793,4317.2 3799.9,4318.1 3806.7,4319.9 3813.2,4322.4 3819.3,4325.7 3825.1,4329.6 3830.4,4334.2 3835.1,4339.3 3839.2,4345 3842.6,4351 3845.3,4357.4 3847.3,4364.1 3848.5,4371 3848.9,4378 3848.5,4384.9 3847.3,4391.8 3845.3,4398.5 3842.6,4404.9 3839.2,4410.9 3835.1,4416.6 3830.4,4421.7 3825.1,4426.3 3819.3,4430.2 3813.2,4433.5 3806.7,4436 3799.9,4437.8 3793,4438.8 3786.1,4439 3779.1,4438.4 3772.3,4437 3765.7,4434.8 3759.3,4431.9 3753.4,4428.3 3747.9,4424.1 3742.9,4419.2 3738.5,4413.8 3734.7,4408 3731.6,4401.7 3729.3,4395.1 3727.7,4388.4 3726.9,4381.4 3726.9,4374.5
  lines w10: 3000.4,3000 3000.4,4574.8 3984.7,4574.8 3984.7,3000 3000.4,3000

## Other copper
Top Layer:
  region net SYS: 3550.9,3647.6 3550.9,3810.5 3555.4,3815 3855.4,3815 3900.4,3770 3900.4,3618.7 3800.5,3618.7 3755.4,3675.4 3755.4,3745 3575.4,3745 3558.4,3728 3558.4,3651.2 3554.8,3647.6
  region net VBUS: 3515.5,3533.5 3523.3,3533.5 3523.3,3497 3511.9,3485.6 3476,3485.6 3465.4,3475 3465.4,3450 3460.4,3445 3430.4,3445 3425.4,3450 3425.4,3485 3440.4,3500 3505.6,3500 3515.5,3509.9
  region net GND: 3568.6,3509.9 3568.6,3540.2 3572.6,3540 3650.4,3540 3667.4,3523.1 3667.4,3385 3610.4,3385 3610.4,3468
  region net GND: 3537.1,3614.2 3572.3,3614.2 3572.6,3614.4 3572.6,3569.8 3537.8,3569.8 3537.8,3613.5
  region net VREF: 3626.7,3639.8 3621.5,3645 3590.4,3645 3586.3,3649.1 3586.3,3671.3 3606.7,3671.3 3620.4,3685 3620.4,3700 3627.2,3706.8 3627.2,3722.7 3730.4,3722.7 3730.4,3690 3725.4,3685 3650.4,3685 3626.7,3661.3
  region net VBAT: 3533.2,3624 3533.2,3671.3 3530.4,3674 3530.4,3705 3506,3729.4 3472.7,3729.4 3460.4,3741.7 3460.4,3785 3465.6,3790.2 3517.6,3790.2 3541.1,3766.7 3541.1,3624 3535.4,3629.7
  region net SYS: 3620.4,3800 3620.4,3990 3615.4,3995 3590.4,3995 3585.4,4000 3585.4,4042.5 3695.4,4042.5 3706.3,4031.6 3706.3,3986.4 3679.9,3960 3679.9,3800
  region net 3V3: 3674.5,4449 3619.5,4449 3614.5,4454 3614.5,4484 3619.5,4489 3674.5,4489
  region net 3V3: 3380.4,4360 3330.4,4360 3331.3,4360.9 3331.3,4429.7 3336.6,4435 3375.4,4435 3380.4,4430
  region net GND: 3390.4,4415 3420.9,4415 3421.2,4414.8 3421.2,4320 3375.4,4320 3370.7,4324.7 3370.7,4340.3 3390.4,4360.1
  region net GND: 3265.4,3390 3265.7,3390.3 3265.7,3415 3325.4,3415 3329.4,3411 3331.3,3411 3331.3,3375 3320.4,3375 3305.4,3390
  region net GND: 3290.4,3665 3295.4,3665 3310.4,3680 3340.4,3680 3345.4,3675 3345.4,3650 3340.4,3645 3298.4,3645 3298.4,3657.1
  region net SW: 3595.4,3285 3550.9,3329.5 3550.9,3509.9 3554.8,3513.8 3554.8,3525 3560.4,3525 3560.4,3500 3595.4,3465 3595.4,3386 3616.5,3365 3670.4,3365 3692.6,3387.2 3693,3470.4 3729.8,3470.4 3802,3530.2 3902.1,3530.6 3900.5,3453.6 3758.7,3285
  region net VBAT: 3470.4,3810 3510.4,3810 3510.7,3806 3511.6,3802 3513.1,3798.3 3515.1,3794.8 3517.6,3791.6 3462,3791.6 3464.9,3794.6 3467.3,3798 3469,3801.8 3470.1,3805.8
  region net $1N30: 3705.4,3543.3 3715.4,3543.3 3715.7,3539.9 3716.7,3536.5 3718.3,3533.4 3720.4,3530.6 3722.9,3528.3 3697.9,3528.3 3700.5,3530.6 3702.6,3533.4 3704.2,3536.5 3705.1,3539.9 3705.4,3543.3
  region net $1N52: 3394,3286 3388.9,3277 3385.3,3279.3 3381.4,3280.9 3377.3,3281.9 3373,3282.3 3388.7,3301.9 3389.1,3297.7 3390.1,3293.5 3391.8,3289.6 3394,3286
  region net $1N52: 3370.4,3332.7 3380.4,3332.7 3380.7,3329.3 3381.7,3325.9 3383.3,3322.8 3385.4,3320 3387.9,3317.7 3362.9,3317.7 3365.5,3320 3367.6,3322.8 3369.2,3325.9 3370.1,3329.3 3370.4,3332.7
  region net VBUS: 3393,3450.1 3393,3475.1 3404.6,3475.4 3416.2,3476.5 3427.7,3478.3 3427.7,3446.8 3416.2,3448.6 3404.6,3449.7 3393,3450.1
  region net GND: 3412.7,3402.4 3412.7,3412.4 3416.2,3412.8 3419.5,3413.7 3422.6,3415.3 3425.4,3417.4 3427.7,3419.9 3427.7,3394.9 3425.4,3397.5 3422.6,3399.6 3419.5,3401.2 3416.2,3402.1 3412.7,3402.4
  region net GND: 3577.6,3672.3 3567.6,3672.3 3569.5,3675.7 3571,3679.4 3571.8,3683.3 3572.1,3687.3 3585.1,3687.3 3582.5,3685 3580.4,3682.2 3578.8,3679.1 3577.9,3675.7 3577.6,3672.3
  region net $1N6: 3594,4389 3586.9,4396.1 3589.1,4399.7 3590.8,4403.6 3591.8,4407.7 3592.1,4411.9 3607.8,4392.3 3603.1,4391.9 3598.4,4390.8 3594,4389
  region net 3V3: 3361.2,4345 3351.2,4345 3351,4352.6 3350.3,4360 3362.1,4360 3361.4,4352.6 3361.2,4345
  region net SDA_B: 3440,4345 3430,4345 3429.7,4352.6 3429.1,4360 3440.9,4360 3440.2,4352.6 3440,4345
  region net SCL_B: 3459.6,4345 3449.6,4345 3449.4,4352.6 3448.7,4360 3460.5,4360 3459.9,4352.6 3459.6,4345
  region net $1N52: 3448.3,3225.2 3448.3,3215.2 3444.8,3214.9 3441.5,3214 3438.4,3212.4 3435.6,3210.3 3433.3,3207.7 3433.3,3232.7 3435.6,3230.2 3438.4,3228.1 3441.5,3226.5 3444.8,3225.6 3448.3,3225.2
  region net $1N52: 3417.8,3250.2 3427.8,3250.2 3428.2,3247.5 3429.3,3245 3431,3242.9 3433.3,3241.3 3412.4,3241.3 3414.6,3242.9 3416.3,3245 3417.4,3247.5 3417.8,3250.2
  region net CC1: 3353,3093.7 3343,3093.7 3342.7,3097.7 3341.6,3101.6 3339.9,3105.3 3337.6,3108.7 3358.5,3108.7 3356.2,3105.3 3354.4,3101.6 3353.4,3097.7 3353,3093.7
  region net CC1: 3322.6,3124.8 3322.6,3134.8 3326,3135.1 3329.3,3136 3332.5,3137.6 3335.2,3139.7 3337.6,3142.3 3337.6,3117.3 3335.2,3119.8 3332.5,3121.9 3329.3,3123.5 3326,3124.4 3322.6,3124.8
  region net CC2: 3390.4,3093.7 3380.4,3093.7 3380.1,3097.7 3379,3101.6 3377.3,3105.3 3375,3108.7 3395.9,3108.7 3393.6,3105.3 3391.8,3101.6 3390.8,3097.7 3390.4,3093.7
  region net CC2: 3380.4,3165.9 3390.4,3165.9 3390.8,3161.8 3391.8,3157.9 3393.6,3154.2 3395.9,3150.9 3375,3150.9 3377.3,3154.2 3379,3157.9 3380.1,3161.8 3380.4,3165.9
  region net $1N51: 3448.3,3134.8 3448.3,3124.8 3444.8,3124.4 3441.5,3123.5 3438.4,3121.9 3435.6,3119.8 3433.3,3117.3 3433.3,3142.3 3435.6,3139.7 3438.4,3137.6 3441.5,3136 3444.8,3135.1 3448.3,3134.8
  region net $1N16: 3715.4,3614.5 3705.4,3614.5 3705.1,3617.9 3704.2,3621.3 3702.6,3624.4 3700.5,3627.1 3697.9,3629.5 3722.9,3629.5 3720.4,3627.1 3718.3,3624.4 3716.7,3621.3 3715.7,3617.9 3715.4,3614.5
  region net GND: 3402.4,3617.6 3384.9,3620.9 3382,3623.5 3378.8,3625.7 3375.3,3627.5 3371.6,3628.8 3392.4,3628.8 3397.3,3623 3402.4,3617.6
  region net $1N18: 3407.4,3577.9 3407.4,3567.9 3402.5,3568.7 3397.5,3569.3 3392.4,3569.5 3392.4,3585.4 3394.8,3582.8 3397.5,3580.7 3400.6,3579.1 3404,3578.2 3407.4,3577.9
  region net $1N14: 3638.1,3600.6 3646.3,3606.5 3649.9,3604.2 3653.8,3602.6 3658,3601.6 3662.2,3601.2 3643.4,3584.7 3643.1,3588.9 3642.1,3593.1 3640.4,3597 3638.1,3600.6
  region net $1N14: 3676.5,3606.5 3682.7,3598.6 3680.5,3595 3678.8,3591 3677.8,3586.9 3677.4,3582.7 3660.6,3601.2 3664.9,3601.6 3669,3602.6 3672.9,3604.2 3676.5,3606.5
  region net $1N13: 3646.3,3623.5 3638.2,3629.5 3640.5,3633.1 3642.1,3637 3643.1,3641.1 3643.4,3645.3 3662.2,3628.8 3658,3628.4 3653.8,3627.4 3649.9,3625.8 3646.3,3623.5
  region net $1N52: 3453.4,3215.2 3453.4,3225.2 3456.9,3223.2 3460.6,3221.7 3464.4,3220.8 3468.4,3220.5 3468.4,3207.7 3466.1,3210.3 3463.3,3212.4 3460.2,3214 3456.9,3214.9 3453.4,3215.2
  region net $1N51: 3453.4,3124.8 3453.4,3134.8 3456.9,3135.1 3460.2,3136 3463.3,3137.6 3466.1,3139.7 3468.4,3142.3 3468.4,3129.5 3464.4,3129.2 3460.6,3128.3 3456.9,3126.8 3453.4,3124.8
  region net VBUS: 3384.1,3471.4 3401.8,3453.7 3398.5,3447.2 3395.9,3440.4 3394,3433.3 3392.8,3426.1 3392.4,3418.8 3358.4,3450.5 3367.5,3456.9 3376.1,3463.9 3384.1,3471.4
  region net VBUS: 3320.9,3423 3320.9,3448 3333.5,3448.3 3346,3449.1 3358.4,3450.5 3358.4,3418.8 3349.1,3420.6 3339.8,3422 3330.4,3422.7 3320.9,3423
  region net $1N52: 3380.4,3344.5 3370.4,3344.5 3370.1,3347.9 3369.2,3351.3 3367.6,3354.4 3365.5,3357.1 3362.9,3359.5 3387.9,3359.5 3385.4,3357.1 3383.3,3354.4 3381.7,3351.3 3380.7,3347.9 3380.4,3344.5
  region net $1N68: 3817.4,3959.7 3817.4,3949.7 3814,3949.3 3810.6,3948.4 3807.5,3946.8 3804.8,3944.7 3802.4,3942.2 3802.4,3967.2 3804.8,3964.6 3807.5,3962.5 3810.6,3960.9 3814,3960 3817.4,3959.7
  region net $1N14: 3755.8,3890.3 3755.8,3900.3 3758.8,3900.7 3761.8,3901.6 3764.4,3903.2 3766.7,3905.3 3768.4,3907.8 3768.4,3882.8 3766.7,3885.4 3764.4,3887.5 3761.8,3889 3758.8,3890 3755.8,3890.3
  region net $1N68: 3845.4,3983.8 3835.4,3983.8 3835.2,3984.6 3834.6,3985.8 3832.4,3989.2 3829.2,3993.3 3825.7,3997.6 3855.2,3997.6 3851.6,3993.3 3848.5,3989.2 3846.3,3985.8 3845.6,3984.6
  region net $1N68: 3808.4,3949.7 3808.4,3959.7 3811.9,3960 3815.2,3960.9 3818.3,3962.5 3821.1,3964.6 3823.4,3967.2 3823.4,3942.2 3821.1,3944.7 3818.3,3946.8 3815.2,3948.4 3811.9,3949.3 3808.4,3949.7
  region net $1N68: 3835.4,3985.5 3845.4,3985.5 3845.7,3982.1 3846.7,3978.7 3848.3,3975.6 3850.4,3972.9 3852.9,3970.5 3827.9,3970.5 3830.5,3972.9 3832.6,3975.6 3834.2,3978.7 3835.1,3982.1 3835.4,3985.5
  region net CC2: 3380.4,3107 3390.4,3107 3390.7,3103.6 3391.7,3100.2 3393.3,3097.1 3395.4,3094.3 3397.9,3092 3384.9,3092 3384.6,3096 3383.8,3099.8 3382.3,3103.5 3380.4,3107
  region net CC1: 3343,3107 3353,3107 3351.9,3102.1 3351.2,3097.1 3351,3092 3335.5,3092 3338.1,3094.3 3340.2,3097.1 3341.8,3100.2 3342.7,3103.6 3343,3107
  region net $1N6: 3585.4,4327 3595.4,4327 3595.8,4323.6 3596.7,4320.2 3598.3,4317.1 3600.4,4314.3 3602.9,4312 3579.2,4312 3581.4,4314.5 3583.1,4317.4 3584.4,4320.5 3585.2,4323.7 3585.4,4327
  region net $1N6: 3595.4,4263 3585.4,4263 3585.2,4266.3 3584.4,4269.5 3583.1,4272.6 3581.4,4275.5 3579.2,4278 3602.9,4278 3600.4,4275.7 3598.3,4272.9 3596.7,4269.8 3595.8,4266.4 3595.4,4263
  region net 3V3: 3685.4,4273 3645.4,4273 3645.1,4303 3644.2,4333 3676,4333 3676.3,4320.8 3677.5,4308.7 3679.4,4296.6 3682,4284.7 3685.4,4273
  region net 3V3: 3645.4,4427 3685.4,4427 3682,4415.3 3679.4,4403.4 3677.5,4391.3 3676.3,4379.2 3676,4367 3644.2,4367 3645.1,4397 3645.4,4427
  region net $1N6: 3585.4,4382 3595.4,4382 3595.8,4378.6 3596.7,4375.2 3598.3,4372.1 3600.4,4369.3 3602.9,4367 3584.9,4367 3585.3,4374.5 3585.4,4382
  region net $1N6: 3595.4,4318 3585.4,4318 3585.3,4325.5 3584.9,4333 3602.9,4333 3600.4,4330.7 3598.3,4327.9 3596.7,4324.8 3595.8,4321.4 3595.4,4318
  region net SCL_B: 3459.6,4173 3449.6,4173 3449.3,4176.4 3448.4,4179.8 3446.8,4182.9 3444.7,4185.7 3442.1,4188 3456,4188 3456.2,4184.1 3456.9,4180.3 3458,4176.5 3459.6,4173
  region net SCL_B: 3449.6,4237 3459.6,4237 3458,4233.5 3456.9,4229.7 3456.2,4225.9 3456,4222 3442.1,4222 3444.7,4224.3 3446.8,4227.1 3448.4,4230.2 3449.3,4233.6 3449.6,4237
  region net 3V3: 3359.6,4219.1 3365.5,4227.3 3369.1,4225 3373.1,4223.4 3377.2,4222.4 3381.4,4222 3364.9,4203.2 3364.5,4207.4 3363.5,4211.6 3361.9,4215.5 3359.6,4219.1
  region net SDA_B: 3430,4327 3440,4327 3440.2,4319.5 3441,4312 3422.5,4312 3425,4314.3 3427.1,4317.1 3428.7,4320.2 3429.6,4323.6 3430,4327
  region net SDA_B: 3410.2,4272.7 3403.9,4280.6 3406.2,4284.2 3407.8,4288.1 3408.9,4292.2 3409.2,4296.5 3426.1,4278 3421.8,4277.6 3417.7,4276.6 3413.8,4275 3410.2,4272.7
  region net 3V3: 3361.2,4263 3351.2,4263 3350.9,4270.5 3349.9,4278 3368.7,4278 3366.1,4275.7 3364,4272.9 3362.5,4269.8 3361.5,4266.4 3361.2,4263
  region net 3V3: 3351.2,4327 3361.2,4327 3361.5,4323.6 3362.5,4320.2 3364,4317.1 3366.1,4314.3 3368.7,4312 3349.9,4312 3350.9,4319.5 3351.2,4327
  region net SCL_B: 3461.9,3658.2 3473.2,3661.1 3476.9,3657.6 3480.8,3654.5 3485,3651.6 3485,3649.3 3472.5,3647.7 3465.3,3647.7 3465.4,3650.5 3464.9,3653.4 3463.7,3656 3461.9,3658.2
  region net P_DP: 3455.8,3530.4 3455.8,3540.4 3460.5,3540.6 3465.3,3541.3 3465.3,3540.4 3465.3,3533.5 3461.9,3533.1 3458.7,3532.1 3455.8,3530.4
  region net $1N6: 3585.4,4271.9 3595.4,4271.9 3595.7,4268.5 3596.6,4265.2 3598,4262.1 3599.9,4259.3 3602.2,4256.9 3578.6,4256.9 3581,4259.3 3582.9,4262.1 3584.3,4265.2 3585.1,4268.5
  region net 3V3: 3658.4,4263.4 3662.8,4239.6 3659.7,4234.9 3657,4229.8 3655,4224.5 3653.5,4219 3652.5,4213.4 3652.2,4207.8 3630.7,4256.9 3636.4,4257.2 3642.1,4257.9 3647.7,4259.2 3653.1,4261.1 3658.4,4263.4
  region net 3V3: 3668,4239.6 3672.5,4263.4 3677.8,4261.1 3683.2,4259.3 3688.8,4257.9 3694.5,4257.2 3700.2,4256.9 3678.6,4207.8 3678.3,4213.4 3677.4,4219 3675.9,4224.5 3673.8,4229.8 3671.2,4234.9 3668,4239.6
  region net VBAT: 3180,3846.3 3180,3806.3 3173.1,3806.1 3166.7,3805.6 3161.8,3804.9 3160.2,3804.5 3159.3,3804.1 3159.3,3848.4 3160.2,3848 3161.8,3847.6 3166.7,3846.9 3173.1,3846.4
  region net CC1: 3251.5,3574.2 3251.5,3584.2 3259,3584.4 3266.5,3585.1 3266.5,3573.3 3259,3574 3251.5,3574.2
  region net P_DN: 3264.6,3555 3264.6,3565 3265.6,3565.1 3266.5,3565.4 3266.5,3553.6 3265.8,3554.6 3264.6,3555
  region net P_DN: 3321.4,3564.5 3321.4,3554.5 3316.4,3554.3 3311.4,3553.6 3311.4,3565.4 3316.4,3564.8 3321.4,3564.5
  region net P_DP: 3321.4,3544.8 3321.4,3534.8 3316.4,3534.6 3311.4,3533.9 3311.4,3545.7 3316.4,3545.1 3321.4,3544.8
  region net P_DN: 3264.9,3515 3264.9,3525 3265.9,3525.3 3266.5,3526.1 3266.5,3514.3 3265.8,3514.8
  region net P_DP: 3326.4,3505.5 3326.4,3495.5 3318.9,3495.2 3311.4,3494.6 3311.4,3506.4 3318.9,3505.7 3326.4,3505.5
  region net CC2: 3251.5,3456.1 3251.5,3466.1 3259,3466.3 3266.5,3467 3266.5,3455.2 3259,3455.9 3251.5,3456.1
  region net GND: 3567.6,3623.5 3577.6,3623.5 3577.9,3621.7 3578.8,3619.5 3580.1,3617.1 3581.6,3615.1 3563.5,3615.1 3565,3617.1 3566.3,3619.5 3567.2,3621.7
  region net GND: 3577.6,3590.8 3567.6,3590.8 3567.2,3592.6 3566.3,3594.9 3565,3597.2 3563.5,3599.2 3581.6,3599.2 3580.1,3597.2 3578.8,3594.9 3577.9,3592.6
  region net $1N16: 3452.4,3613.3 3444.5,3603.3 3440.5,3602.9 3436.1,3602 3444,3618.2 3444.5,3617.2 3445.3,3616.4 3446.3,3615.5 3447.4,3614.8 3448.6,3614.2 3449.9,3613.7 3451.2,3613.4
  region net $1N16: 3705.4,3602.6 3715.4,3602.6 3715.8,3600.8 3716.7,3598.6 3718,3596.2 3719.4,3594.2 3701.4,3594.2 3702.9,3596.2 3704.2,3598.6 3705.1,3600.8
  region net $1N14: 3679.1,3594.9 3672,3602 3673.1,3603.5 3674,3605.8 3674.8,3608.3 3675.1,3610.8 3687.9,3598 3685.4,3597.7 3682.9,3596.9 3680.6,3596
  region net SDA_B: 3435.4,3693.7 3425.4,3693.7 3425.1,3695.5 3424.2,3697.7 3422.9,3700.1 3421.4,3702.1 3439.4,3702.1 3438,3700.1 3436.7,3697.7 3435.8,3695.5
  region net SCL_B: 3470.4,3683.7 3460.4,3683.7 3460.1,3685.5 3459.2,3687.7 3457.9,3690.1 3456.4,3692.1 3474.4,3692.1 3473,3690.1 3471.7,3687.7 3470.8,3685.5
  region net VBUS: 3452.3,3495 3452.3,3485 3450.5,3484.7 3448.3,3483.7 3445.9,3482.5 3443.9,3481 3443.9,3499 3445.9,3497.5 3448.3,3496.3 3450.5,3495.3
  region net SCL_B: 3449.6,4175.7 3459.6,4176.9 3460,4175 3461,4172.7 3462.3,4170.4 3463.9,4168.5 3445.9,4167.3 3447.3,4169.4 3448.5,4171.8 3449.3,4174
  region net SDA_B: 3400.4,4261.3 3410.4,4261.3 3410.8,4259.5 3411.7,4257.3 3413,4254.9 3414.4,4252.9 3396.4,4252.9 3397.9,4254.9 3399.2,4257.3 3400.1,4259.5
  region net GND: 3332.1,3408.1 3339.2,3401 3338.2,3399.5 3337.2,3397.3 3336.5,3394.7 3336.1,3392.3 3323.4,3405 3325.8,3405.4 3328.4,3406.1 3330.6,3407.1
  region net $1N14: 3748.5,3895.1 3755.5,3888 3754.5,3886.5 3753.5,3884.3 3752.8,3881.7 3752.4,3879.2 3739.7,3892 3742.1,3892.4 3744.7,3893.1 3746.9,3894.1
  region net GND: 3514.4,3625.6 3514.1,3620.2 3513.3,3614.9 3511.8,3609.8 3509.9,3604.8 3507.4,3600 3504.4,3595.6 3519.3,3590.6 3534.4,3595.6 3531.4,3600 3528.9,3604.8 3527,3609.8 3525.5,3614.9 3524.7,3620.2 3524.4,3625.6 3514.4,3625.6
  region net GND: 3537.6,3595.6 3542.9,3595.8 3548.2,3596.7 3553.4,3598.1 3558.4,3600.1 3563.1,3602.6 3567.6,3605.6 3572.6,3589.3 3567.6,3575.6 3563.1,3578.5 3558.4,3581 3553.4,3583 3548.2,3584.4 3542.9,3585.3 3537.6,3585.6 3537.6,3595.6
  region net 3V3: 3647.5,4224.2 3650.9,4227.1 3654.7,4229.3 3658.9,4230.8 3663.2,4231.6 3667.6,4231.6 3672,4230.8 3676.1,4229.3 3680,4227.1 3683.4,4224.2 3697.5,4238.4 3683.5,4256.4 3647.4,4256.4 3633.4,4238.4 3647.5,4224.2
  region net 3V3: 3697.5,4238.4 3683.4,4224.2 3671.7,4235.4 3659.5,4245.9 3684.4,4258.7 3686.8,4253.1 3689.9,4247.8 3693.4,4242.9 3697.5,4238.4
  region net P_DP: 3353.8,3518.4 3353.5,3521.4 3352.6,3524.3 3351.1,3527 3349,3529.2 3346.6,3531 3343.8,3532.3 3358.8,3537.3 3373.8,3532.3 3371.1,3531 3368.6,3529.2 3366.6,3527 3365.1,3524.3 3364.1,3521.4 3363.8,3518.4 3353.8,3518.4
Bottom Layer:
  region net 3V3: 3180.5,4100 3179.5,4060 3172.6,4059.8 3166.2,4059.4 3161.3,4058.8 3159.7,4058.4 3158.8,4058.1 3159.8,4102.4 3160.7,4101.9 3162.3,4101.5 3167.2,4100.7 3173.6,4100.2
  region net $1N16: 3448,3605.5 3441,3598.5 3439.4,3599.5 3437.2,3600.5 3434.6,3601.2 3432.2,3601.6 3444.9,3614.3 3445.3,3611.9 3446,3609.3 3447,3607.1
  region net $1N16: 3702.4,3571.2 3695.3,3578.3 3696.4,3579.8 3697.3,3582 3698.1,3584.6 3698.4,3587.1 3711.2,3574.3 3708.7,3573.9 3706.2,3573.2 3703.9,3572.2
  region net $1N14: 3695.1,3625.1 3702.2,3618.1 3701.2,3616.5 3700.2,3614.3 3699.5,3611.7 3699.1,3609.3 3686.4,3622 3688.8,3622.4 3691.4,3623.1 3693.6,3624.1
  region net SDA_B: 3425.4,3726.3 3435.4,3726.3 3435.8,3724.5 3436.7,3722.3 3438,3719.9 3439.4,3717.9 3421.4,3717.9 3422.9,3719.9 3424.2,3722.3 3425.1,3724.5
  region net SCL_B: 3460.4,3716.3 3470.4,3716.3 3470.8,3714.5 3471.7,3712.3 3473,3709.9 3474.4,3707.9 3456.4,3707.9 3457.9,3709.9 3459.2,3712.3 3460.1,3714.5
  region net VBUS: 3383.3,3494.4 3408.3,3504.8 3414.6,3499.2 3396.3,3495.5 3396.3,3495.8 3396.1,3496 3395.1,3496 3391.1,3494.9 3388.8,3494.3 3386.5,3493.9 3384.6,3493.9 3383.9,3494.1
  region net 3V3: 3320.3,4420.9 3328.5,4441 3330.7,4439 3332.7,4437.3 3334.3,4436.1 3335.1,4435.8 3330.1,4418.8 3329.5,4419.3 3328.5,4419.6 3325.7,4419.6 3324.2,4419.7 3322.7,4419.9 3321.4,4420.2
  region net 3V3: 3373.5,4442.3 3387.7,4428.1 3386.2,4426.5 3384.9,4424.9 3382.5,4421.6 3380.6,4418.6 3378.9,4416.5 3361.9,4433.5 3364,4435.2 3367,4437.1 3370.3,4439.5 3372,4440.8
  region net SCL_B: 3469,4153.5 3461.9,4146.5 3460.9,4146.9 3459.2,4147.4 3457,4147.8 3454.7,4148 3467.4,4160.8 3467.7,4158.4 3468,4156.2 3468.5,4154.5
  region net SDA_B: 3410.4,4228.7 3400.4,4228.7 3400.1,4230.5 3399.2,4232.7 3397.9,4235.1 3396.4,4237.1 3414.4,4237.1 3413,4235.1 3411.7,4232.7 3410.8,4230.5
  region net $1N14: 3745.4,3863.7 3735.4,3863.7 3735.1,3865.5 3734.2,3867.7 3732.9,3870.1 3731.4,3872.1 3749.4,3872.1 3748,3870.1 3746.7,3867.7 3745.8,3865.5
  region net 3V3: 3377.5,4417.9 3384.3,4423.6 3391.5,4428.8 3399.1,4433.4 3407,4437.5 3415.2,4441 3423.6,4443.9 3432.2,4446.1 3440.9,4447.7 3449.7,4448.7 3458.6,4449 3394.5,4469 3344.5,4449 3347.9,4448.7 3351.3,4447.8 3354.4,4446.3 3357.2,4444.2 3359.5,4441.6 3361.4,4438.7 3362.7,4435.5 3363.4,4432.1 3377.5,4417.9
  region net 3V3: 3377.5,4417.9 3363.4,4432.1 3363.6,4434 3363.2,4435.9 3362.3,4437.5 3360.9,4438.9 3359.2,4439.7 3357.3,4440 3405.4,4440 3398,4435.1 3390.8,4429.8 3384,4424 3377.5,4417.9

## Silkscreen, mask and mechanical layers (free items; w line width, h text height)
Top Silkscreen Layer:
  text "TO MB" at 3335.4,4510 h45
  text "G 3V3" at 3270.4,4185 h45 r270
  text "3V3" at 3055.4,4065 h45 r90
  text "1 G / 2 SCL / 3 SDA / 4-5 G / 6-8 3V3" at 3335.4,3935 h45
  text "G  B" at 3275.4,3920 h45 r270
  text "BAT" at 3055.4,3815 h45 r90
  text "IIC 0x4B" at 3680.4,3310 h45
Bottom Silkscreen Layer:
  text "M3" at 3745.4,4300 h45 r45
Mechanical Layer:
  drawing of 220 lines, arcs and shapes, not listed